# EAGLE board p-eagle (EAGLE 9.6.2)
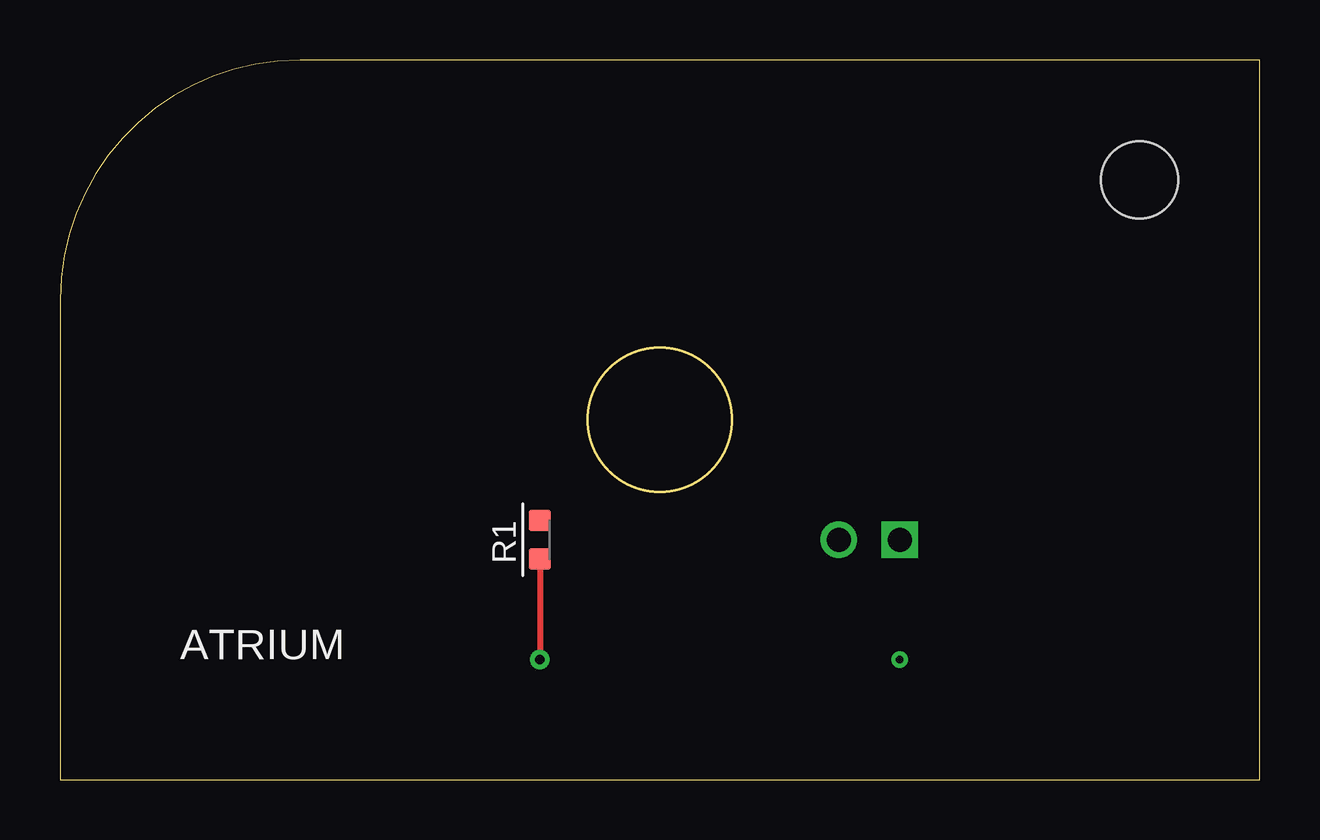
[diagram p0: board, top side]
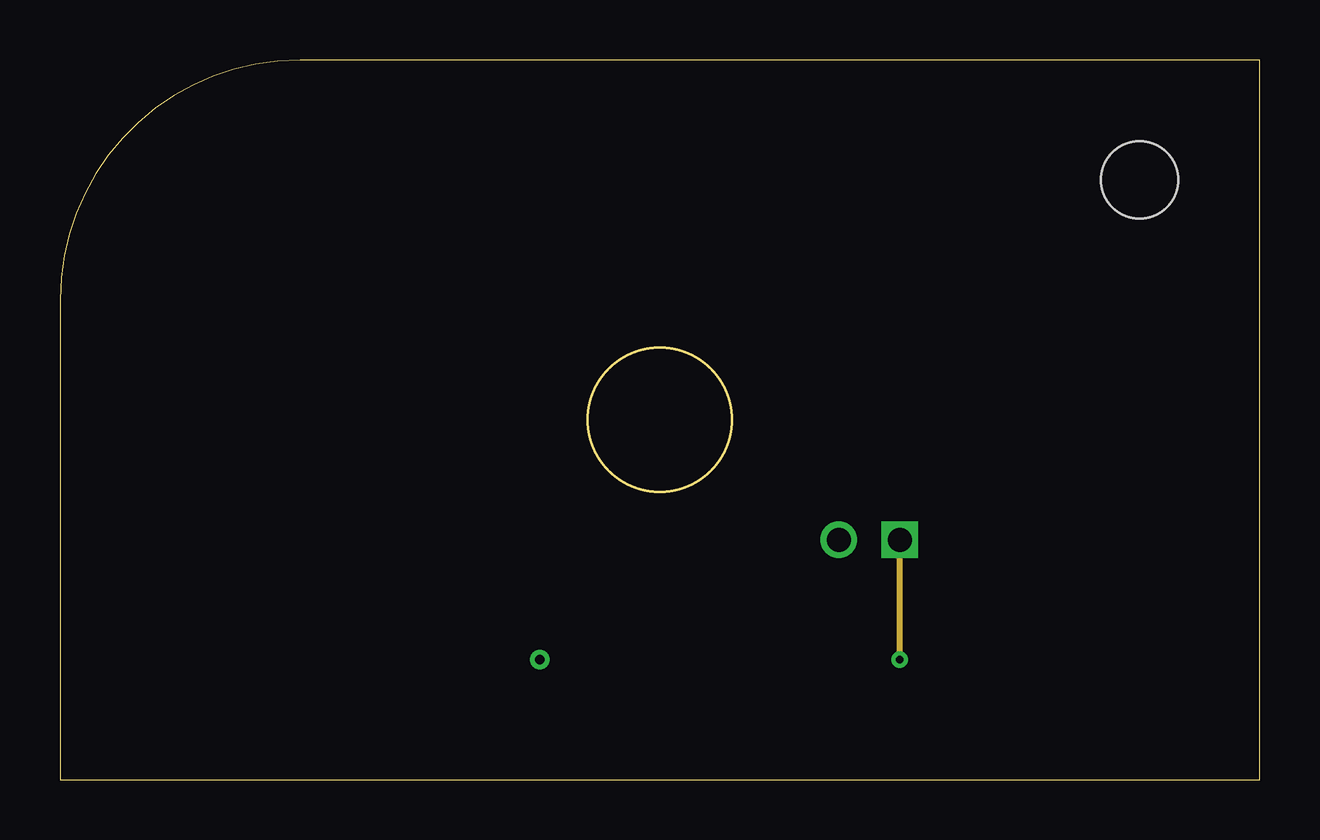
[diagram p1: board, inner layer Route2]
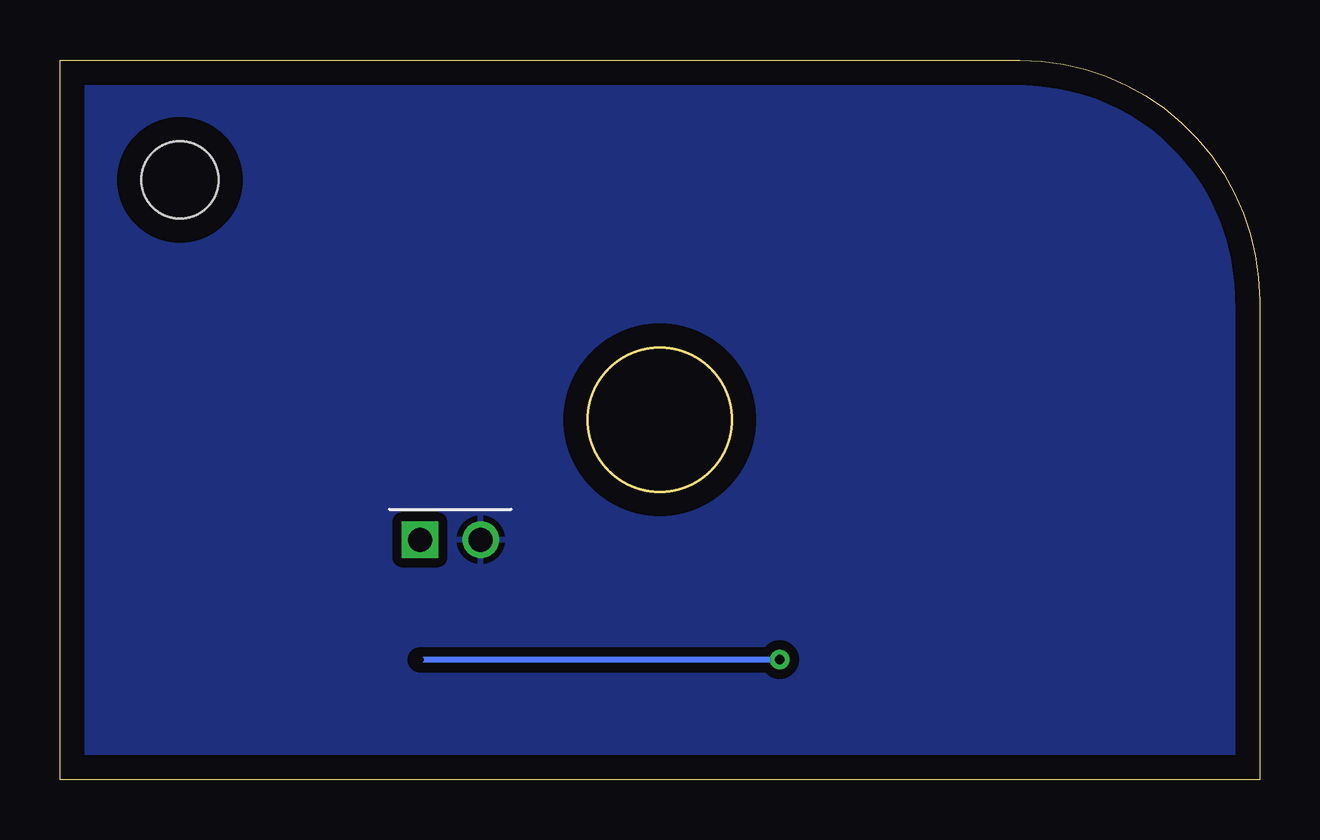
[diagram p2: board, bottom side, seen from below]

Size 50 x 30 mm. Coordinates in mm from the lower left corner, seen from the top.
Outline: 0,0 50,0 50,30 10,30 arc90 0,20 0,0
Outline: circle at 25,15 radius 3
Copper layers (1*2*15*16): Top / Route2 / Route15 / Bottom
Design rules "default": minimum track width 10mil, minimum drill 0.35mm, track to track 8mil, minimum pad ring 10mil, minimum via ring 8mil
Net classes: 1 power: width 0.5 mm, drill 0.4 mm, clearance 0.3 mm
Holes 3.2 mm at 45,25

## Footprints (pad centres in the part's own frame; a part is rotated, then mirrored left to right if it is on the bottom)
HDR2 = drill 1 square: 1 0,0 | drill 1: 2 2.54,0
R0603 = smd 0.9 x 0.9: 1 -0.8,0; 2 0.8,0

## Placement (x,y rotation side)
J1  [HDR2]  35,10 0 bottom
R1  10k  [R0603]  20,10 90 top

## Library data of the parts
J1 R1 = atrium-test

## Nets
GND [power]: J1.2 R1.2
SIG: J1.1 R1.1

## Tracks (layer width: path | path; a pad name or v marks a point on that pad's centre or on a via)
GND
  pour Bottom (isolate 0.4): 1,1 49,1 49,29 1,29
SIG  (via drill 0.3 pad 0.6 layers 1-2, 0.4)
  Top 0.254: R1.1 v20,5
  Route2 0.254: v35,5 J1.1
  Bottom 0.254: v20,5 v35,5

## Text on the board
tPlace: ATRIUM